# Altium PCB STEP_DRIVER_V3.0.PcbDoc (part 5 of 5)
Units mm, origin at the board's own origin, x right, y up, seen from the top; angles counter-clockwise.
Board outline 245.25 x 200.25 mm, 2 copper layers (Top Layer, Bottom Layer), stack 1.371 mm thick; 477 components, 170 nets, 1104 pads, 876 vias.
Unrouted connection lines stored in the file: 4.
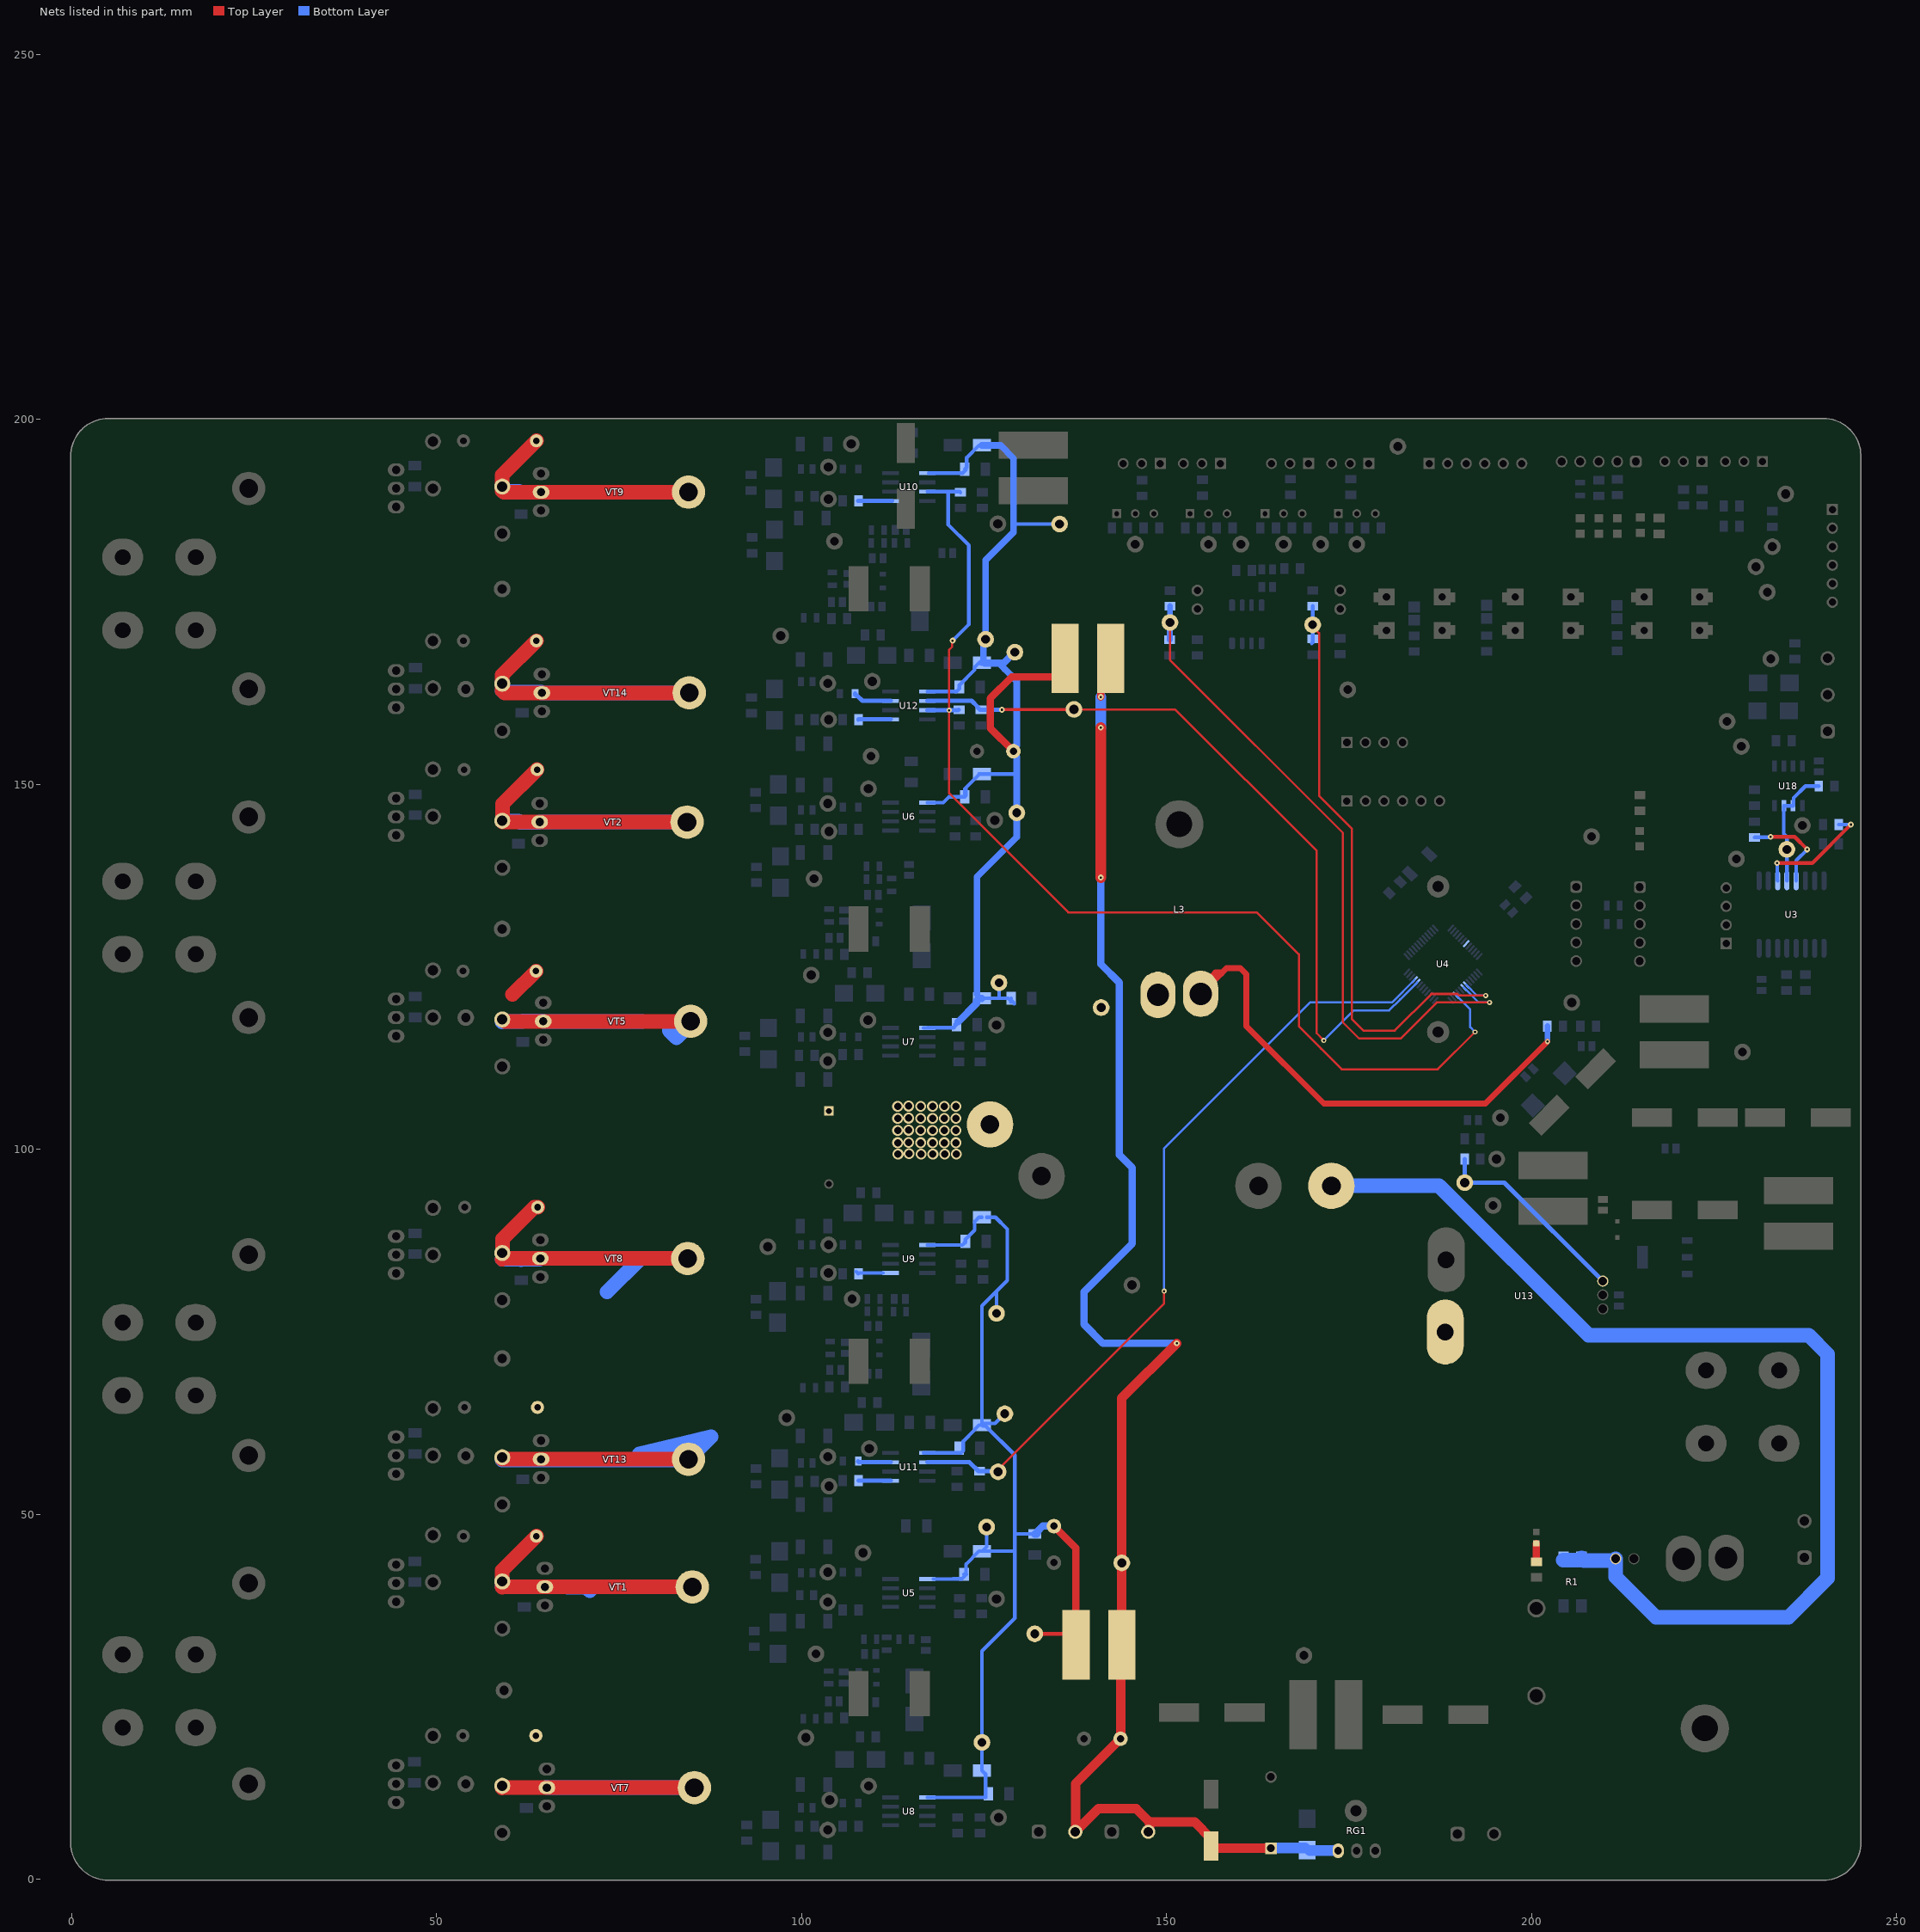
[diagram p4: the nets of this part, all layers, seen from the top]

## Via types
v1: diameter 0.7/0.7 (per signal layer), hole 0.3, Top Layer to Bottom Layer, tented both sides, 388 vias
v2: diameter 1.5/0.7 (per signal layer), hole 1, Top Layer to Bottom Layer, tented both sides, 206 vias
v3: diameter 0.8, hole 0.3, Top Layer to Bottom Layer, tented both sides, 99 vias
v4: diameter 1.5, hole 1, Top Layer to Bottom Layer, 96 vias
v5: diameter 0.5, hole 0.254, Top Layer to Bottom Layer, tented both sides, 42 vias
v6: diameter 1.27, hole 0.711, Top Layer to Bottom Layer, tented both sides, 22 vias
v7: diameter 1.27, hole 0.711, Top Layer to Bottom Layer, 17 vias
v8: diameter 1.27, hole 0.711, Top Layer to Bottom Layer, tented top, 2 vias
v9: diameter 1, hole 0.5, Top Layer to Bottom Layer, 2 vias
v10: diameter 0.7, hole 0.254, Top Layer to Bottom Layer, tented both sides, 2 vias

## Nets (pads, with @x,y where several pads share a name; then routed paths per layer and width w, separated by ;. In a path a pad name is that pad's centre, name@x,y a point inside that pad or via, vN(x,y) a via of type N, cw(c..) or ccw(c..) an arc to the next point about the centre after c; other vN are vias at no path point) (continued)
NetR50_2: R50.2 R82.2 U4.22 U10.3 U12.3 | length 154.2
  Top Layer w0.3: v3(120.7,169.7) 120.639,169.64 120.639,168.85 120.189,168.4 120.189,160.192 v1(120.229,160.153) 120.229,148.796 136.55,132.475 162.368,132.475 168.125,126.718 168.125,116.854 171.179,113.8 174.004,110.975 187.168,110.975 v1(192.268,116.075)
  Bottom Layer w0.3: U4.22@189.656,121.117 191.6,119.172 191.6,116.743 v1(192.268,116.075)
  Bottom Layer w0.5: U10.3@117.232,190.101 120.1,190.101 ; v3(120.7,169.7) 122.925,171.925 122.925,182.743 120.1,185.568 120.1,190.101 ; R50.2@121.768,190.001 121.668,190.101 120.1,190.101
  Bottom Layer w0.6: U12.3@117.232,160.175 117.243,160.164 120.218,160.164 v1(120.229,160.153) 120.248,160.172 121.456,160.172 R82.2@121.51,160.226
NetR51_2: R51.2 U9.5 | length 3.8
  Bottom Layer w0.5: R51.2@107.493,83.24 R51.2@107.769,82.965 ; R51.2@107.769,83.071 U9.5@111.133,83.071
NetR52_2: R52.2 U10.5 | length 4.7
  Bottom Layer w0.6: R52.2@107.742,188.857 107.769,188.831 U10.5@112.204,188.831 U10.5@112.383,188.831
NetR54_2: R54.2 TP3.1 U13.3 | length 27.7
  Bottom Layer w0.6: R54.2@190.862,98.675 TP3.1@190.862,95.445 196.287,95.445 U13.3@209.779,81.953
NetR75_1: R75.1 U11.7 | length 4.5
  Bottom Layer w0.6: R75.1@107.768,57.29 107.768,57.24 107.873,57.135 U11.7@112.204,57.135
NetR78_1: R78.1 U12.7 | length 5.4
  Bottom Layer w0.6: R78.1@107.343,162.436 107.343,162.286 107.493,162.136 107.643,162.136 108.334,161.445 U12.7@112.204,161.445
NetR79_2: R79.2 TP61.1 U4.33 U11.2 | length 107.7
  Top Layer w0.3: TP61.1@126.718,55.9 149.678,78.86 v1(149.678,80.575)
  Bottom Layer w0.3: v1(149.678,80.575) 149.678,100.128 169.675,120.125 180.882,120.125 183.995,123.238 U4.33@183.999,123.238
  Bottom Layer w0.6: U11.2@117.232,57.135 123.007,57.135 R79.2@124.242,55.9 ; R79.2@124.242,55.9 TP61.1@126.8,55.9
NetR81_2: R81.2 TP62.1 U4.32 U12.2 | length 104.4
  Top Layer w0.3: v3(127.45,160.225) v3@127.475,160.25 ; 136.062,160.25 136.087,160.275 ; TP62.1@137.975,160.275 151.175,160.275 170.568,140.882 170.568,115.9 v1(171.543,114.925)
  Top Layer w0.4: v3@127.475,160.25 136.062,160.25 ; 136.087,160.275 TP62.1@137.975,160.275
  Bottom Layer w0.3: v1(171.543,114.925) 175.648,119.03 180.498,119.03 182.001,120.533 U4.32@184.352,122.884
  Bottom Layer w0.6: U12.2@117.232,161.445 123.296,161.445 124.142,160.599 124.142,160.513 124.445,160.21 124.596,160.21 124.604,160.217 127.442,160.217 v3(127.45,160.225)
NetR91_1: R91.1 R95.2 TP17.1 U4.19 | length 96.3
  Top Layer w0.3: TP17.1@150.469,171.819 150.469,167.056 174.156,143.369 174.156,117.412 176.393,115.175 182.068,115.175 187.018,120.125 v1(194.251,120.125)
  Bottom Layer w0.3: U4.19@190.716,122.177 192.768,120.125 v1(194.251,120.125)
  Bottom Layer w0.8: R91.1@150.414,169.799 150.441,169.826 150.441,172.153 TP17.1@150.469,172.181 R95.2@150.469,174.416
NetR92_1: R92.1 R96.2 TP18.1 U4.18 | length 85.8
  Top Layer w0.3: TP18.1@170.023,171.867 170.023,171.6 170.891,170.732 170.891,148.459 175.418,143.932 175.418,117.825 176.968,116.275 181.279,116.275 186.296,121.292 189.85,121.292 190.055,121.087 193.706,121.087 v1(193.718,121.075)
  Bottom Layer w0.3: U4.18@191.07,122.531 192.513,121.087 193.706,121.087 v1(193.718,121.075)
  Bottom Layer w0.5: 169.896,169.309 170.023,169.436 TP18.1@170.023,171.867 R96.2@170.023,174.447
NetR103_2: R103.2 U11.5 | length 4.4
  Bottom Layer w0.5: R103.2@107.769,54.623 R103.2@107.783,54.609
  Bottom Layer w0.6: R103.2@107.797,54.595 U11.5@112.204,54.595
NetR104_2: R104.2 U12.5 | length 4.5
  Bottom Layer w0.5: R104.2@107.743,158.846 107.769,158.871 R104.2@107.802,158.905
  Bottom Layer w0.6: R104.2@107.802,158.905 U12.5@112.204,158.905
NetR119_2: R119.2 U3.13 | length 12.9
  Top Layer w0.5: v3(232.75,142.817) 236.057,142.817 v3(237.777,141.097)
  Bottom Layer w0.5: R119.2@230.55,142.724 230.597,142.771 232.703,142.771 v3(232.75,142.817) ; U3.13@236.26,136.8 236.26,139.579 v3(237.777,141.097)
NetR121_1: R121.1 VD18.2 | length 2.5
  Top Layer w1: R121.1@200.675,43.501 VD18.2@200.675,45.976
NetR122_2: R122.2 U3.11 | length 16.4
  Top Layer w0.5: v3(233.65,139.225) 238.488,139.225 v3(243.762,144.499)
  Bottom Layer w0.5: v3(233.65,139.225) 233.685,139.19 233.685,136.835 U3.11@233.72,136.8 ; R122.2@242.098,144.499 v3(243.762,144.499)
NetR125_2: R125.2 TP12.1 U3.12 U18.2 U18.3 | length 16.9
  Bottom Layer w0.5: U3.12@234.99,136.8 234.99,142.817 234.565,143.242 U18.3@234.565,147.063 U18.2@235.835,147.063 235.903,147.131 235.903,148.144 237.534,149.775 R125.2@239.349,149.775
NetU4_7: U4.7
V_BAT: C7.2 C14.1 C32.1 C39.1 C42.1 C48.2 C56.2 C69.1 C70.2 C71.1 C73.2 C74.2 C75.1 C76.1 C79.2 C80.1 C81.2 C82.1 L3.2 TP6.1 VD1.2 VD2.2 VD5.2 VD6.2 VD9.2 VD10.2 VD13.2 VD14.2 VT1.D VT2.D VT5.D VT7.D VT8.D VT9.D VT13.D VT14.D | length 457.6
  Top Layer w2: VD14.2@58.99,57.546 VT13.D@64.317,57.546 VT13.D@84.51,57.546 VT13.D@84.543,57.546 ; VD5.2@59,12.514 VD5.2@59.032,12.546 ; VD5.2@59,12.546 VD5.2@59.032,12.546 ; VD1.2@59,40.008 VD1.2@59,40.8 59,42.325 C14.1@63.675,47 ; VD9.2@59,84.975 59.038,85.013 59.038,87.721 63.392,92.075 C82.1@63.85,92.075 ; VD6.2@59,117.8 59.054,117.8 59.308,117.546 VT5.D@64.617,117.546 VT5.D@84.81,117.546 ; VD13.2@59,162.805 VD13.2@59,163.8 59,165 C76.1@63.675,169.675 ; VD10.2@59,190.195 VD10.2@59,190.8 59,192.4 C80.1@63.675,197.075 ; VD5.2@59.038,12.553 VD5.2@59.032,12.546 ; VD1.2@59.038,40.046 59.054,40.062 59.18,40.062 59.195,40.046 VT1.D@64.834,40.046 VT1.D@85.027,40.046 ; VD2.2@59.038,145.117 59.038,145.205 59.054,145.221 59.054,147.304 C32.1@63.775,152.025 ; VD2.2@59.054,144.846 VT2.D@64.117,144.846 VT2.D@84.31,144.846 ; VD13.2@59.054,162.805 59.313,162.546 VT14.D@64.417,162.546 VT14.D@84.61,162.546 ; VD10.2@59.054,190.195 59.203,190.046 VT9.D@64.317,190.046 VT9.D@84.51,190.046 ; VD9.2@59.083,85.013 59.18,85.013 59.212,85.046 VT8.D@64.217,85.046 ; 60.414,121.214 C71.1@63.625,124.425 ; VT8.D@64.217,85.075 VT8.D@83.689,85.075 ; VT7.D@85.31,12.546 VT7.D@65.117,12.546 VD5.2@59.032,12.546
  Bottom Layer w2: VD14.2@58.99,57.435 64.317,57.435 VT13.D@84.399,57.435 ; VD1.2@59,40.1 C48.2@61.964,40.065 ; VD9.2@59,84.975 59.038,84.937 61.563,84.937 C73.2@61.6,84.9 61.635,84.935 64.106,84.935 VT8.D@64.217,85.046 VT8.D@84.41,85.046 ; VD6.2@59,117.475 59.038,117.513 61.738,117.513 C70.2@61.8,117.575 64.588,117.575 VT5.D@64.617,117.546 78.206,117.546 ; VD13.2@59,162.805 59.054,162.805 59.209,162.65 C79.2@61.725,162.65 64.313,162.65 VT14.D@64.417,162.546 VT14.D@84.61,162.546 ; VD2.2@59.054,145.025 59.092,144.987 61.213,144.987 61.425,144.775 64.046,144.775 VT2.D@64.117,144.846 VT2.D@84.31,144.846 ; VD10.2@59.054,190.195 59.092,190.157 C74.2@61.284,190.157 ; C74.2@61.756,190.046 VT9.D@64.174,190.046 ; C48.2@62.025,40.077 64.834,40.045 70.557,39.978 70.975,39.55 ; VT9.D@64.46,190.046 VT9.D@84.51,190.046 ; VT7.D@65.049,12.614 VT7.D@65.117,12.546 VT7.D@85.31,12.546 ; 73.362,80.475 77.869,84.982 ; 77.779,58.277 83.977,59.766 87.6,60.636 VT13.D@84.51,57.546 ; 81.865,116.299 82.864,115.3 VT5.D@84.81,117.246
  other v2: 113.218,99.35 116.368,99.35 117.993,99.35 119.618,99.35 121.193,99.35 114.718,99.4 113.168,100.9 116.318,100.9 117.943,100.9 119.568,100.9 121.143,100.9 114.668,100.95 113.168,102.575 116.318,102.575 117.943,102.575 119.568,102.575 121.143,102.575 114.668,102.625 113.168,104.225 116.318,104.225 117.943,104.225 119.568,104.225 121.143,104.225 114.668,104.275 113.168,105.875 116.318,105.875 117.943,105.875 119.568,105.875 121.143,105.875 114.668,105.925
V_PS: C38.1 J12.2 L3.1 R1.2 R53.2 U13.5 | length 223.8
  Top Layer w0.8: L3.1@154.674,121.298 154.972,121.596 157.51,124.134 158.212,124.836 160.098,124.836 160.95,123.983 160.95,116.889 171.564,106.275 193.691,106.275 v1(202.192,114.776) ; L3.1@155.156,121.412 L3.1@156.108,121.412
  Top Layer w1: L3.1@154.674,121.298 154.674,122.06 156.748,124.134 157.51,124.134 ; C38.1@171.79,95 C38.1@172.593,95
  Bottom Layer w0.8: v1(202.192,114.776) R53.2@202.192,116.875
  Bottom Layer w2: C38.1@173.15,95 187.35,95 207.8,74.55 237.975,74.55 240.575,71.95 240.575,41.275 235.2,35.9 217.075,35.9 211.537,41.438 J12.2@211.537,43.916 211.296,43.675 207.175,43.675 R1.2@206.85,44 ; R1.2@204.35,43.7 R1.2@206.85,43.7
VCC: C3.2 C5.1 D32.1 J1.2 J13.2 L7.1 L8.1 RG1.1 TP88.1 ZD4.2 | length 224.2
  Top Layer w1: v3@141,137.25 v3(141.009,137.241) ; v3(141,161.975) 141,165.925 L7.1@142.35,167.275 ; L8.1@143.718,31.968 L8.1@143.875,32.125 ; J1.2@147.5,6.5 J1.2@147.682,6.682 ; 147.682,7.6 147.906,7.825 ; C3.2@156.125,5.55 C3.2@156.125,4.55 C3.2@156.438,4.237
  Top Layer w1.3: J13.2@137.495,6.505 140.666,9.675 145.825,9.675 147.5,8 ; J13.2@137.57,6.505 137.57,13.12 C5.1@143.7,19.25 ; C5.1@143.718,19.25 L8.1@143.718,31.968 ; L8.1@143.875,32.125 TP88.1@143.875,43.342 143.875,65.9 v3(151.4,73.425) ; J1.2@147.682,6.682 147.682,7.6 ; 147.906,7.825 153.85,7.825 C3.2@156.125,5.55 ; C3.2@156.438,4.237 D32.1@164.3,4.237
  Top Layer w1.5: v3@141,137.25 v3(141,157.775)
  Bottom Layer w1: v3(141.009,137.241) 141.009,125.367 143.525,122.851 143.525,99.25 145.3,97.475 145.3,87.075 138.7,80.475 138.7,76.025 141.3,73.425 v3(151.4,73.425) ; D32.1@164.3,4.237 D32.1@164.3,4.277 ; ZD4.2@168.973,4.277 ZD4.2@169.25,4 ; ZD4.2@169.3,4.277 ZD4.2@169.627,3.95 ; RG1.1@173.47,3.95 RG1.1@173.52,3.9
  Bottom Layer w1.5: v3(141,157.775) v3(141,161.975) ; D32.1@164.3,4.277 ZD4.2@168.973,4.277 ; ZD4.2@169.627,3.95 RG1.1@173.47,3.95
VCC_DRV_1: C4.1 C9.2 C15.2 C25.2 C34.2 C86.2 D1.2 D10.2 D11.2 D19.2 L8.2 TP79.1 TP81.1 TP83.1 TP85.1 TP89.1 U5.1 U8.1 U9.1 U11.1 | length 169.2
  Top Layer w0.5: TP89.1@131.95,33.625 136.125,33.625 137.575,32.175 L8.2@137.625,32.125
  Top Layer w1: C4.1@134.575,48.375 137.575,45.375 137.575,32.175 L8.2@137.575,31.879
  Bottom Layer w0.5: U11.1@116.712,58.411 117.403,58.411 117.409,58.417 117.421,58.405 121.843,58.405 122.143,58.705 122.143,59.994 123.768,61.619 123.768,61.665 124.318,62.215 D19.2@124.718,62.215 ; U8.1@117.232,11.214 125.208,11.214 125.208,14.407 D10.2@124.718,14.897 TP81.1@124.718,18.757 124.718,31.268 129.218,35.768 129.218,44.946 ; U9.1@117.232,86.881 122.043,86.881 122.443,87.281 C25.2@122.443,87.404 122.443,87.654 123.718,88.929 123.718,90.091 124.318,90.691 D11.2@124.718,90.691 ; U5.1@118.067,41.139 120.718,41.139 120.725,41.146 121.934,41.146 C9.2@122.568,41.779 ; C9.2@122.268,41.779 122.521,42.033 122.521,43.149 124.318,44.946 D1.2@124.718,44.946 D1.2@124.75,44.946 ; D19.2@124.818,62.115 125.218,62.115 129.218,58.115 129.218,47.3 ; TP79.1@125.35,48.25 125.35,45.546 D1.2@124.75,44.946 ; D11.2@125.35,90.691 126.559,90.691 128.19,89.06 128.19,82.036 126.718,80.564 ; TP83.1@126.718,77.525 126.718,80.564 ; TP85.1@127.85,63.775 126.511,62.436 124.939,62.436 D19.2@124.718,62.215 ; C86.2@131.95,47.3 129.218,47.3 ; D19.2@124.718,62.215 124.718,62.436 124.718,78.564 126.718,80.564 ; D1.2@124.75,44.946 129.218,44.946 ; 129.218,44.946 129.218,47.3
  Bottom Layer w1: C86.2@131.95,47.3 132.2,47.3 132.35,47.45 132.35,47.7 133.025,48.375 C4.1@134.575,48.375
VCC_DRV_2: C11.2 C16.2 C30.2 C36.2 C87.2 C88.1 D2.2 D6.2 D12.2 D20.2 L7.2 TP78.1 TP80.1 TP82.1 TP84.1 TP87.1 U6.1 U7.1 U10.1 U12.1 | length 170.9
  Top Layer w0.5: L7.2@134.475,164.7 136.1,166.325 L7.2@136.1,167.275
  Top Layer w1: C88.1@129.025,154.55 125.85,157.725 125.85,161.775 128.775,164.7 L7.2@134.475,164.7
  Bottom Layer w0.5: U7.1@116.724,116.634 U7.1@117.232,116.634 ; U6.1@117.232,147.49 119.397,147.49 120.192,148.285 C11.2@122.359,148.285 ; U12.1@117.232,162.715 121.22,162.715 121.62,163.115 C36.2@121.62,163.35 121.62,163.6 123.718,165.698 123.718,166.052 124.418,166.752 124.718,166.752 125.218,166.752 D20.2@125.067,166.601 ; U7.1@117.273,116.675 120.861,116.675 120.993,116.807 C16.2@120.993,117.097 ; U10.1@117.411,192.641 120.666,192.641 ; 120.666,192.64 122.061,192.64 C30.2@122.522,193.1 ; C16.2@121.211,117.065 121.211,117.223 C16.2@121.461,117.473 ; C30.2@122.343,193.175 122.622,193.454 122.622,194.755 124.318,196.451 D12.2@124.718,196.451 ; 122.537,149.521 122.537,148.464 C11.2@122.359,148.285 ; D6.2@124.05,121.298 D6.2@124.484,120.864 ; D2.2@124.31,151.419 D2.2@124.718,151.419 ; D6.2@124.318,120.698 127.07,120.698 ; D2.2@124.354,151.376 122.359,149.381 122.359,148.464 C11.2@122.359,148.285 ; D2.2@124.718,151.427 129.488,151.427 ; TP84.1@124.92,169.575 TP84.1@125.218,169.873 ; TP80.1@127.05,122.825 127.07,122.805 127.07,120.698 ; 127.837,165.802 127.846,165.802 ; C87.2@128.678,120.172 128.678,120.338 128.318,120.698 127.07,120.698 ; C87.2@128.718,120.698 128.718,120.332 128.834,120.332 129.118,120.048 C87.2@129.118,119.932 ; 129.05,185.675 TP82.1@135.35,185.675
  Bottom Layer w0.9: D6.2@124.05,121.298 124.05,137.357 129.488,142.795 129.488,151.427 129.488,153.789 129.025,154.252 129.025,154.848 129.481,155.303 129.481,164.167 127.846,165.802 ; D20.2@124.718,166.652 124.92,166.854 124.92,169.2 124.953,169.233 124.953,169.543 TP84.1@124.92,169.575 ; D12.2@124.718,196.451 127.267,196.451 129.05,194.668 129.05,185.675 129.05,184.55 125.218,180.718 TP84.1@125.218,169.873 ; 127.038,166.601 127.338,166.302 127.837,165.802
  Bottom Layer w1: C16.2@121.461,117.473 123.968,119.98 123.968,120.348 124.318,120.698 D6.2@124.686,120.698 ; D20.2@125.067,166.601 127.038,166.601 127.637,166.601 TP87.1@129.148,168.112
  Bottom Layer w2: TP87.1@129.148,168.112 TP87.1@129.225,168.112
pads on no net: L2.GND L3.GND P11.2 R2.1 R10.1 R10.2 R83.2 R84.2 R85.1 R86.1 R87.1 R87.2 R93.1 R93.2 R94.1 R94.2 R97.1 R98.1 R98.2 R99.1 R99.2 R100.1 R100.2 R101.1 R101.2 R102.1 R102.2 U3.3 U3.14
copper on no net: | length 27.1
  Bottom Layer w0.254: 223.75,15.725 223.75,20.548
  Bottom Layer w0.3: 180.525,135.131 180.632,135.024 180.632,133.676 185.413,128.895 ; 191.07,128.188 194.549,131.667 194.549,133.926 194.549,134.39 194.708,134.548 194.708,134.966 195.603,135.861 197.646,135.861 197.753,135.968 ; 207.03,250.311 207.089,250.37
  Bottom Layer w1: 166.91,193.963 166.91,193.978 166.924,193.963 166.949,193.938 166.949,191.814 166.975,191.788

## Polygon pours and split planes (outlines as drawn)
GND_2 on Bottom Layer "NONET_L-01_P-001" (solid, pour order 124): 225.228,132.592 245.188,132.592 245.188,171.288 234.345,171.288 225.228,162.17
GND on Bottom Layer "GND_L02_P122" (solid, pour order 122): 13.466,0.009 0.336,13.139 0.336,186.836 13.375,199.875 230.768,199.875 245,185.643 245,172.815 232.878,172.678 223.075,162.875 223.075,130.64 227.886,130.64 229.276,129.25 245.114,129.25 245,15.123 229.886,0.009
V_BAT on Bottom Layer "NONET_L-01_P-001" (solid, pour order 121): 64.888,198.55 64.888,195.63 62.45,193.191 62.45,191.221 66.27,191.221 66.27,189.137 63.209,189.137 58.395,189.137 57.875,189.657 57.875,195.053 61.372,198.55
V_BAT on Bottom Layer "NONET_L-01_P-001" (solid, pour order 120): 64.733,171.77 64.733,167.896 62.541,165.705 62.541,163.631 66.114,163.631 66.114,161.546 63.054,161.546 58.24,161.546 57.51,162.276 57.51,167.253 62.027,171.77
V_BAT on Bottom Layer "NONET_L-01_P-001" (solid, pour order 119): 64.836,154.264 64.836,150.611 62.331,148.106 62.331,145.835 66.217,145.835 66.217,143.751 63.157,143.751 58.343,143.751 57.613,144.48 57.613,149.457 62.42,154.264
V_BAT on Bottom Layer "NONET_L-01_P-001" (solid, pour order 118): 64.891,126.671 64.891,122.871 62.725,120.705 62.725,118.606 66.273,118.606 66.273,116.521 63.212,116.521 58.398,116.521 57.669,117.251 57.669,122.228 62.111,126.671
V_BAT on Bottom Layer "NONET_L-01_P-001" (solid, pour order 117): 64.791,94.275 64.791,90.883 62.086,88.177 62.086,86.01 66.173,86.01 66.173,83.925 63.112,83.925 58.45,83.925 57.569,84.806 57.569,89.632 62.212,94.275
V_BAT on Bottom Layer "NONET_L-01_P-001" (solid, pour order 116): 64.916,66.624 64.916,63.235 62.211,60.53 62.211,58.485 66.298,58.485 66.298,56.4 63.237,56.4 58.423,56.4 57.694,57.13 57.694,62.107 62.211,66.624
V_BAT on Bottom Layer "NONET_L-01_P-001" (solid, pour order 115): 64.718,49.171 64.718,45.297 63.039,43.618 63.039,41.032 66.099,41.032 66.099,38.947 63.039,38.947 58.225,38.947 57.495,39.677 57.495,44.654 62.012,49.171
V_BAT on Bottom Layer "NONET_L-01_P-001" (solid, pour order 96): 64.879,21.925 64.879,17.804 63.2,16.126 63.2,13.539 66.26,13.539 66.26,11.454 63.2,11.454 58.386,11.454 57.656,12.184 57.656,17.161 62.42,21.925
NetC12_1 on Bottom Layer "NONET_L-01_P-001" (solid, pour order 109): 61.4,38.501 57.9,34.08 57.9,32.55 61.571,32.55 66.283,36.325 66.283,38.501
NetC29_1 on Bottom Layer "NONET_L-01_P-001" (solid, pour order 108): 60.345,83.361 57.61,79.643 57.61,77.443 60.863,77.443 65.392,81.071 65.392,83.431
NetC31_1 on Bottom Layer "NONET_L-01_P-001" (solid, pour order 107): 60.269,188.421 57.67,184.89 57.67,182.69 60.923,182.69 65.452,186.318 65.452,188.494
NetC7_1 on Bottom Layer "NONET_L-01_P-001" (solid, pour order 106): 60.338,143.137 57.74,139.606 57.74,137.406 60.993,137.406 65.522,141.034 65.522,143.21
V_BAT on Bottom Layer "NONET_L-01_P-001" (solid, pour order 104): 63.852,194.658 89.325,194.575 89.325,198.55 63.245,198.55 62.425,197.731 62.425,196.085
V_BAT on Bottom Layer "NONET_L-01_P-001" (solid, pour order 103): 64.084,167.265 70.617,167.239 70.617,171.739 64.084,171.739 62.55,170.206 62.55,168.799
V_BAT on Bottom Layer "NONET_L-01_P-001" (solid, pour order 102): 64.009,149.79 70.542,149.764 70.542,154.264 64.009,154.264 62.475,152.731 62.475,151.324
V_BAT on Bottom Layer "NONET_L-01_P-001" (solid, pour order 101): 63.733,122.197 70.267,122.171 70.267,126.671 63.733,126.671 62.2,125.138 62.2,123.731
V_BAT on Bottom Layer "NONET_L-01_P-001" (solid, pour order 100): 63.871,90.014 70.617,89.987 70.617,94.275 64.083,94.275 62.55,92.742 62.55,91.335
V_BAT on Bottom Layer "NONET_L-01_P-001" (solid, pour order 99): 63.984,62.451 70.517,62.425 70.517,66.625 63.684,66.625 62.45,65.392 62.45,63.985
V_BAT on Bottom Layer "NONET_L-01_P-001" (solid, pour order 98): 63.95,44.697 70.484,44.671 70.484,49.171 63.95,49.171 62.417,47.638 62.417,46.231
V_BAT on Bottom Layer "NONET_L-01_P-001" (solid, pour order 97): 64.233,17.451 70.767,17.425 70.767,21.925 64.233,21.925 62.7,20.392 62.7,18.985
NetC37_1 on Bottom Layer "NETC37_1_L02_P080" (solid, pour order 80): 51.769,155.19 46.76,160.198 46.76,164.395 54.155,164.395 57.604,160.946 65.56,160.946 65.56,158.699 61.225,155.19
NetC41_1 on Bottom Layer "NETC41_1_L02_P079" (solid, pour order 79): 58.745,109.589 52.878,109.589 47.077,115.39 47.077,118.884 55.056,118.884 58.066,115.875 65.737,115.875 65.737,113.536 60.862,109.589
NetC35_1 on Bottom Layer "NETC35_1_L02_P078" (solid, pour order 78): 58.728,49.994 52.339,49.994 47.06,55.273 47.06,59.143 54.582,59.143 57.704,56.021 65.72,56.021 65.72,53.661 61.191,49.994
NetC24_1 on Bottom Layer "NETC24_1_L02_P073" (solid, pour order 73): 59.407,4.899 53.017,4.899 47.739,10.178 47.739,14.375 54.393,14.375 57.843,10.925 66.399,10.925 66.399,8.565 61.87,4.899
NetC76_2 on Bottom Layer "NETC76_2_L02_P076" (solid, pour order 76): 43.337,192.185 43.337,193.726 47.798,198.187 54.221,198.187 56.629,196.137 56.629,181.816 60.404,178.119 60.404,174.597 52.187,165.387 45.854,165.387 45.071,164.659 43.075,164.679 43.075,181.834 51.1,189.859 51.1,191.091 50.045,192.146
NetC32_2 on Bottom Layer "NETC32_2_L02_P075" (solid, pour order 75): 43.215,147.225 43.215,148.502 47.938,153.225 54.361,153.225 56.769,151.175 56.769,136.528 60.544,132.831 60.544,129.636 51.678,119.698 45.211,119.698 43.286,119.698 43.215,136.873 51.034,144.692 51.034,146.336 50.185,147.185
NetC75_2 on Bottom Layer "NETC75_2_L02_P074" (solid, pour order 74): 43.322,87.234 43.322,88.864 47.695,93.237 54.118,93.237 56.526,91.187 56.526,76.713 60.301,73.016 60.301,69.647 52.084,60.437 45.751,60.437 44.968,59.709 43.322,59.725 43.322,76.997 51,84.675 51,86.138 49.942,87.196
V_BAT on Bottom Layer "V_BAT_L02_P004" (solid, pour order 4): 67.625,2.775 67.625,197.725 89.343,197.725 89.343,2.775
NetC37_1 on Bottom Layer "NETC37_1_L02_P037" (solid, pour order 37): 3.9,157.019 3.9,174.881 41.022,174.881 41.022,157.019
NetC7_1 on Bottom Layer "NETC7_1_L02_P036" (solid, pour order 36): 3.745,133.175 3.745,151.036 41.022,151.036 41.022,133.175
NetC41_1 on Bottom Layer "NETC41_1_L02_P035" (solid, pour order 35): 3.745,111.969 3.745,129.831 41.022,129.831 41.022,111.969
NetC29_1 on Bottom Layer "NETC29_1_L02_P034" (solid, pour order 34): 3.616,73.125 3.616,90.986 41.022,90.986 41.022,73.125
NetC35_1 on Bottom Layer "NETC35_1_L02_P033" (solid, pour order 33): 3.745,52.069 3.745,69.931 41.022,69.931 41.022,52.069
NetC24_1 on Bottom Layer "NETC24_1_L02_P031" (solid, pour order 31): 14.657,7.069 3.745,17.981 3.745,24.931 41.022,24.931 41.022,7.069
NetC14_2 on Bottom Layer "NETC14_2_L02_P040" (solid, pour order 40): 43.296,42.225 43.296,43.502 48.019,48.225 54.442,48.225 56.85,46.175 56.85,31.896 60.625,28.199 60.625,24.635 52.409,15.425 46.075,15.425 45.292,14.697 43.296,14.717 43.296,31.872 51.115,39.691 51.115,41.335 50.266,42.184
NetC31_1 on Bottom Layer "NETC31_1_L02_P038" (solid, pour order 38): 3.781,178.337 3.823,182.707 17.467,196.35 41.022,196.35 41.022,178.337
NetC12_1 on Bottom Layer "NETC12_1_L02_P032" (solid, pour order 32): 3.8,28.194 3.8,46.056 41.022,46.056 41.022,28.194
V_BAT on Bottom Layer "V_BAT_L02_P009" (solid, pour order 9): 126.193,107.623 126.193,98.25 119.509,98.25 117.772,96.825 101.953,96.825 85.025,79.898 85.025,117.763 95.165,107.623
V_BAT on Bottom Layer "V_BAT_L02_P007" (solid, pour order 7): 116.1,104.725 116.1,98.85 81.525,98.85 81.525,104.725
GND on Top Layer "tgh" (solid, pour order 57): 13.718,-0.25 -0.12,13.587 -0.12,186.345 13.535,200 230.85,200 245.114,185.736 245.114,172.786 232.875,172.675 223.075,162.875 223.075,130.64 227.886,130.64 229.276,129.25 245.114,129.25 245.114,14.309 230.555,-0.25
GND_2 on Top Layer "NONET_L-01_P-001" (solid, pour order 123): 225.228,132.525 245.188,132.525 245.188,171.22 234.345,171.22 225.228,162.103
V_BAT on Top Layer "NONET_L-01_P-001" (solid, pour order 92): 64.617,125.096 64.617,122.677 62.564,120.625 62.564,116.454 58.394,116.454 57.664,117.184 57.664,122.564 60.647,125.547 63.314,125.547 64.077,125.547
V_BAT on Top Layer "NONET_L-01_P-001" (solid, pour order 114): 65.14,19.96 65.14,17.894 63.461,16.215 63.461,11.544 58.647,11.544 57.917,12.273 57.917,17.25 61.331,20.664 64.436,20.664
GND on Top Layer "GND_L01_P111" (solid, pour order 111): 132.125,75.175 132.125,66.225 114.754,66.225 114.754,75.175
NetJ3_2 on Top Layer "NETJ3_2_L01_P053" (solid, pour order 53): 195.7,89.225 187.008,89.225 187.008,80.559 190.691,80.559 206.35,64.9 236.674,64.9 236.674,74.76 210.165,74.76
GND on Top Layer "GND_L01_P110" (solid, pour order 110): 131.625,134.2 131.625,125.15 114.229,125.15 114.229,134.2
GND on Top Layer "GND_L01_P113" (solid, pour order 113): 132.069,180.757 132.069,171.698 114.824,171.698 114.824,180.757
GND on Top Layer "GND_L01_P112" (solid, pour order 112): 134.125,30.25 134.125,21.2 114.904,21.2 114.904,30.25
NetC76_2 on Top Layer "NETC76_2_L01_P048" (solid, pour order 48): 109.175,180.775 109.175,172.85 95.825,172.85 50.375,172.85 50.375,180.775
NetC32_2 on Top Layer "NETC32_2_L01_P047" (solid, pour order 47): 109.077,134.05 109.077,126.33 96.045,126.33 50.053,126.33 50.053,134.05
NetC75_2 on Top Layer "NETC75_2_L01_P046" (solid, pour order 46): 109.175,74.95 109.175,67.025 96.294,67.025 50.575,67.025 50.575,74.95
NetC14_2 on Top Layer "NETC14_2_L01_P045" (solid, pour order 45): 109.13,29.325 109.13,21.4 48.175,21.4 48.175,29.325 96.045,29.325
NetC7_1 on Top Layer "NETC7_1_L01_P068" (solid, pour order 68): 58.53,137.367 52.141,137.367 46.862,142.646 46.862,146.576 54.174,146.576 57.613,143.137 65.522,143.137 65.522,141.034 60.993,137.367
V_BAT on Top Layer "NONET_L-01_P-001" (solid, pour order 95): 64.937,47.371 64.937,45.304 62.614,42.982 62.614,38.954 58.444,38.954 57.714,39.684 57.714,44.414 61.347,48.047 63.364,48.047 64.127,48.047
V_BAT on Top Layer "NONET_L-01_P-001" (solid, pour order 94): 64.879,64.981 64.879,62.915 62.556,60.592 62.556,56.45 58.501,56.45 57.656,57.295 57.656,62.656 60.658,65.658 64.069,65.658
V_BAT on Top Layer "NONET_L-01_P-001" (solid, pour order 93): 65.054,92.371 65.054,90.909 62.28,88.136 62.28,83.875 58.544,83.875 57.831,84.588 57.831,89.659 61.219,93.047 63.481,93.047 64.244,93.047
V_BAT on Top Layer "NONET_L-01_P-001" (solid, pour order 91): 64.85,152.295 64.85,150.836 62.331,148.317 62.331,143.925 58.526,143.925 57.613,144.838 57.613,149.653 60.884,152.925 64.096,152.925
V_BAT on Top Layer "NONET_L-01_P-001" (solid, pour order 90): 64.933,170.073 64.933,168.007 62.61,165.684 62.61,161.657 58.44,161.657 57.71,162.387 57.71,167.21 61.25,170.75 63.36,170.75 64.123,170.75
V_BAT on Top Layer "NONET_L-01_P-001" (solid, pour order 89): 64.798,197.573 64.798,195.507 62.475,193.184 62.475,188.976 58.485,188.976 57.665,189.796 57.665,194.668 61.247,198.25 63.225,198.25 63.988,198.25
NetC76_2 on Top Layer "NONET_L-01_P-001" (solid, pour order 88): 54.139,198.204 46.367,198.204 43.238,195.075 43.238,192.172 46.394,192.172 47.319,193.097 52.187,193.097 54.642,195.551 54.642,197.701
NetC76_2 on Top Layer "NONET_L-01_P-001" (solid, pour order 87): 54.159,170.654 46.387,170.654 43.258,167.525 43.258,164.622 46.414,164.622 47.34,165.547 52.208,165.547 54.662,168.001 54.662,170.151
NetC32_2 on Top Layer "NONET_L-01_P-001" (solid, pour order 86): 54.164,153.079 46.392,153.079 43.263,149.95 43.263,147.047 46.419,147.047 47.344,147.972 52.212,147.972 54.667,150.426 54.667,152.576
NetC32_2 on Top Layer "NONET_L-01_P-001" (solid, pour order 85): 54.251,125.625 46.35,125.625 43.286,122.561 43.286,119.657 46.441,119.657 47.367,120.582 52.235,120.582 54.689,123.036 54.689,125.187
NetC75_2 on Top Layer "NONET_L-01_P-001" (solid, pour order 84): 54.114,93.179 46.342,93.179 43.213,90.05 43.213,87.147 46.369,87.147 47.294,88.072 52.162,88.072 54.9,90.81 54.9,92.393
NetC75_2 on Top Layer "NONET_L-01_P-001" (solid, pour order 83): 54.183,65.792 46.411,65.792 43.282,62.663 43.282,59.759 46.438,59.759 47.363,60.684 52.231,60.684 54.85,63.303 54.85,65.124
NetC14_2 on Top Layer "NONET_L-01_P-001" (solid, pour order 82): 54.189,48.204 46.417,48.204 43.288,45.075 43.288,42.172 46.444,42.172 47.369,43.097 52.237,43.097 54.692,45.551 54.692,47.701
NetC14_2 on Top Layer "NONET_L-01_P-001" (solid, pour order 81): 54.197,20.75 46.425,20.75 43.296,17.621 43.296,14.717 46.452,14.717 47.378,15.643 52.246,15.643 54.7,18.097 54.7,20.247
NetC24_1 on Top Layer "NETC24_1_L01_P077" (solid, pour order 77): 59.407,4.899 53.017,4.899 47.739,10.178 47.739,14.375 54.393,14.375 57.843,10.925 66.399,10.925 66.399,8.565 61.87,4.899
NetC12_1 on Top Layer "NETC12_1_L01_P072" (solid, pour order 72): 59.168,32.567 52.779,32.567 47.5,37.846 47.5,41.776 53.849,41.776 57.2,38.425 66.16,38.425 66.16,36.233 61.631,32.567
NetC35_1 on Top Layer "NETC35_1_L01_P027" (solid, pour order 27): 3.941,52.069 3.941,70.059 41.022,70.059 41.022,52.069
NetC35_1 on Top Layer "NETC35_1_L01_P071" (solid, pour order 71): 58.725,49.997 52.336,49.997 47.057,55.276 47.057,59.206 54.544,59.206 57.825,55.925 65.717,55.925 65.717,53.664 61.188,49.997
NetC29_1 on Top Layer "NETC29_1_L01_P070" (solid, pour order 70): 58.368,77.429 51.979,77.429 46.7,82.708 46.7,86.638 54.499,86.638 57.742,83.395 65.36,83.395 65.36,81.095 60.831,77.429
NetC41_1 on Top Layer "NETC41_1_L01_P069" (solid, pour order 69): 60.839,109.589 52.878,109.589 47.153,115.314 47.153,119.244 54.431,119.244 57.8,115.875 65.813,115.875 65.813,113.518 61.625,110.247
NetC31_1 on Top Layer "NETC31_1_L01_P067" (solid, pour order 67): 58.46,182.671 52.071,182.671 46.792,187.949 46.792,191.88 54.477,191.88 57.916,188.44 65.452,188.44 65.452,186.337 60.923,182.671
NetC37_1 on Top Layer "NETC37_1_L01_P065" (solid, pour order 65): 57.693,155.917 51.451,155.917 46.9,160.468 46.9,164.399 54.201,164.399 57.641,160.959 65.56,160.959 65.56,158.856 61.93,155.917
V_PS on Top Layer "V_PS_L01_P054" (solid, pour order 54): 160.95,124.5 160.95,116.891 183.05,94.791 183.05,82.508 186.435,79.123 189.884,79.123 189.884,70.523 182.602,70.523 170.321,82.804 170.321,92.662 152.261,110.722 152.261,115.1 152.261,109.3 152.261,121.109 152.261,124.5
V_BAT on Top Layer "V_BAT_L01_P055" (solid, pour order 55): 111.707,96.825 111.821,108.526 124.472,108.526 127.246,111.08 142.621,125.236 146.17,125.236 151.245,116.854 136.359,101.967 129.55,100.525 126.193,98.25 119.509,98.25 117.738,96.825
NetC31_1 on Top Layer "NETC31_1_L01_P021" (solid, pour order 21): 3.792,178.083 3.872,183.102 17.166,196.396 41.149,196.396 41.022,178.083
NetC24_1 on Top Layer "NETC24_1_L01_P029" (solid, pour order 29): 14.508,7.075 3.745,17.838 3.745,24.9 41.022,24.9 41.022,7.075
NetC12_1 on Top Layer "NETC12_1_L01_P028" (solid, pour order 28): 3.745,28.208 3.745,46.015 41.022,46.015 41.022,28.208
NetC29_1 on Top Layer "NETC29_1_L01_P026" (solid, pour order 26): 3.745,72.783 3.745,90.887 41.022,90.887 41.022,72.783
NetC41_1 on Top Layer "NETC41_1_L01_P025" (solid, pour order 25): 3.65,111.969 3.65,129.934 41.022,129.934 41.022,111.969
NetC7_1 on Top Layer "NETC7_1_L01_P024" (solid, pour order 24): 3.745,132.858 3.745,151.15 41.022,151.15 41.022,132.858
NetC37_1 on Top Layer "NETC37_1_L01_P023" (solid, pour order 23): 3.745,157.019 3.745,175.034 41.022,175.034 41.022,157.019

## Other copper
Top Layer:
  rectangle net GND: 190.05,17.7 194.4,28.775
  rectangle net GND: 153.3,10.55 158.85,12.35
  rectangle net GND: 150.7,17.516 153.271,27.1
  rectangle net GND: 112.749,192.92 117.203,200
  rectangle net GND: 187.95,20.525 195.975,25.975
  rectangle net GND: 148.325,19.95 154.8,25.125
  pour cut-out: 98.4,173.401 98.4,172.065 99.814,172.065 99.814,173.401
  pour cut-out: 97.812,127.408 97.812,125.95 99.337,125.95 99.337,127.408
  pour cut-out: 97.993,67.901 97.993,66.565 99.689,66.565 99.689,67.901
  pour cut-out: 98.546,22.611 98.546,21.275 102.093,21.275 102.093,22.611
  pour cut-out: 225.228,132.525 225.228,162.125 233.678,170.575 248.243,170.575 248.243,172.812 232.875,172.675 223.075,162.875 223.075,130.95 225.781,130.95 226.361,131.53 226.996,131.53 229.276,129.25 246.55,129.25 246.55,132.5 246.575,132.525
  pour cut-out: 216.865,39.64 230.884,39.64 230.884,49.09 216.865,49.09
  pour cut-out: 208.275,83.1 208.275,76.945 211.3,76.945 211.3,83.1
Bottom Layer:
  pour cut-out: 104.952,23.026 104.952,21.097 106.919,21.097 106.919,23.026
  pour cut-out: 105.051,68.391 105.051,66.461 107.017,66.461 107.017,68.391
  pour cut-out: 104.83,127.65 104.83,125.721 106.797,125.721 106.797,127.65
  pour cut-out: 105.358,173.685 105.358,171.756 107.324,171.756 107.324,173.685
  pour cut-out: 225.228,132.525 225.228,162.125 233.678,170.575 248.243,170.575 248.243,172.815 232.878,172.678 223.075,162.875 223.075,130.95 225.781,130.95 226.361,131.53 226.996,131.53 229.276,129.25 246.55,129.25 246.55,132.5 246.575,132.525
  pour cut-out: 216.475,49.1 216.475,39.3 230.875,39.3 230.925,39.25 230.925,48.925 230.75,49.1

## Silkscreen, mask and mechanical layers (free items; w line width, h text height)
Top Overlay:
  circle w0.254: c239.55,5 r2.5
  circle w0.254: c240,195 r2.5
  circle w0.254: c5,195 r2.5
  circle w0.254: c43.868,100.3 r2.5
  circle w0.254: c5,4.975 r2.5
  text "5V" at 164.791,197.579 h0.8 r90
  text "5V" at 144.516,197.514 h0.8 r90
  text "5V" at 173.067,197.493 h0.8 r90
  text "5V" at 226.846,197.491 h0.8 r90
  text "5V" at 152.715,197.454 h0.8 r90
  text "D3+" at 175.675,197.346 h0.8 r90
  text "INT" at 221.316,197.354 h0.8 r90
  text "5V" at 218.734,197.339 h0.8 r90
  text "GND" at 232.008,197.237 h0.8 r90
  text "GND" at 157.92,197.2 h0.8 r90
  text "GND" at 149.495,197.15 h0.8 r90
  text "GND" at 169.914,197.138 h0.8 r90
  text "GND" at 223.958,197.162 h0.8 r90
  text "TIM" at 229.386,197.154 h0.8 r90
  text "D4-" at 146.85,197.092 h0.8 r90
  text "D4+" at 155.355,197.092 h0.8 r90
  text "D3-" at 167.42,197.092 h0.8 r90
  text "GND" at 178.215,197.092 h0.8 r90
  text "5V" at 204.447,196.967 h0.8 r90
  text "L1" at 206.987,196.967 h0.8 r90
  text "L2" at 209.461,196.967 h0.8 r90
  text "L3" at 212.067,196.967 h0.8 r90
  text "GND" at 214.724,196.554 h0.8 r90
  text "4" at 11.525,187.95 h3
  text "5V" at 188.591,187.954 h0.8 r90
  text "3.3V" at 234.129,187.654 h0.8
  text "GND" at 199.491,187.104 h0.8 r90
  text "3.3V" at 186.091,186.404 h0.8 r90
  text "STOP" at 193.991,186.129 h0.8 r90
  text "START" at 191.291,185.679 h0.8 r90
  text "H" at 19.639,185.629 h0.8 r90
  text "CLEAR" at 196.516,185.504 h0.8 r90
  text "5V" at 235.687,185.177 h0.8
  text "RX" at 235.731,182.194 h0.8
  text "TX" at 235.509,180.069 h0.8
  text "STOP" at 199.449,177.954 h1.2
  text "START" at 181.145,177.8 h1.2
  text "CLEAR" at 216.568,177.77 h1.2
  text "DIR" at 234.907,177.419 h0.8
  text "GND" at 234.767,174.641 h0.8
  text "A" at 232.65,169.35 h1
  text "L" at 18.697,167.246 h0.8 r270
  text "GND" at 231.625,161.664 h1
  text "3.3V" at 175.165,158.101 h0.8 r90
  text "DIO" at 177.375,158.101 h0.8 r90
  text "CLC" at 180.138,158.101 h0.8 r90
  text "GND" at 182.881,158.101 h0.8 r90
  text "B" at 232.75,156.973 h1
  text "GND" at 187.918,151.25 h0.8 r90
  text "RX_1" at 185.39,151.187 h0.8 r90
  text "3.3V" at 174.982,151.06 h0.8 r90
  text "DIO" at 177.903,151.06 h0.8 r90
  text "CLC" at 180.443,151.06 h0.8 r90
  text "TX_1" at 182.977,151.06 h0.8 r90
  text "3" at 9.075,145.225 h3
  text "DIR" at 216.875,142.1 h1
  text "H" at 19.414,140.629 h0.8 r90
  text "GND" at 209.054,135.954 h0.8
  text "SCL" at 209.154,132.929 h0.8
  text "SDA" at 209.219,130.554 h0.8
  text "3.3V" at 209.229,128.129 h0.8
  text "5V" at 209.229,125.304 h0.8
  text "L" at 18.447,122.471 h0.8 r270
  text "2" at 9.7,84.225 h3
  text "H" at 19.414,80.679 h0.8 r90
  text "L" at 18.422,62.646 h0.8 r270
  text "GND    VCC" at 243.525,54.925 h2 r90
  text "1" at 10.7,38.475 h3
  text "H" at 19.214,35.479 h0.8 r90
  text "b" at 153.55,30.808 h40
  text "L" at 18.372,17.371 h0.8 r270
  text "-" at 120.237,15.862 h0.8 r180
  text "IN GND  +14V  GND  +14V" at 127.254,0.804 h1
  text "5V" at 187.704,0.529 h1.2
  text "GND" at 194.179,0.529 h1.2
Bottom Overlay:
  text "4" at 13.762,188.078 h3
  text "3" at 11.312,145.353 h3
  text "2" at 11.937,84.353 h3
  text "1" at 12.937,38.603 h3
  text "jekadesigner777@gmail.com" at 52.721,1.512 h1.52
Top Solder:
  lines w0.254: 223.8,59.6 223.925,59.725
  lines w2: 60.569,115.006 64.617,115.006
  lines w3: 126.396,103.525 125.468,103.525 125.864,103.129 129.254,103.129 148.25,122.125 148.768,122.125 ; 154.45,119.85 154.45,117.025 177.525,93.95 177.525,83.168 185.535,75.158 189.193,75.158
  lines w4: 151.859,69.125 178.113,69.125 187.638,59.6 209.488,59.6 223.8,59.6 ; 162.593,69.454 162.593,95 ; 223.925,59.725 233.925,59.725
  lines w5: 59.244,70.905 106.176,70.905 ; 59.344,130.205 106.276,130.205 ; 59.644,176.73 106.576,176.73 ; 60.068,25.45 107,25.45 ; 117.198,130.034 128.875,130.1 ; 117.225,70.8 129.529,70.914 ; 117.425,176.788 129.35,176.8 ; 117.575,25.45 130.283,25.478 ; 188.189,84.636 194.002,84.636 208.913,69.725 233.925,69.725
  text "5mm" at 76.525,24.8 h1.52
Bottom Solder:
  region: 80.329,144.846
  region: 80.329,144.846
  region: 72.75,143.7
  region: 72.75,143.7
  lines w0.254: 80.329,162.546 84.61,162.546 ; 81.589,187.125 80.329,187.125 81.829,187.125 ; 83.25,190.046 84.51,190.046 ; 84.471,190.007 84.51,190.046 ; 84.848,13.008 85.31,12.546 ; 129.35,176.25 133.175,176.25 ; 132.893,98.653 134.05,97.496 ; 84.51,190.046 84.51,190.046
  lines w2: 60.569,115.006 64.617,115.006 ; 79.968,13.4 79.968,103.125 80.549,103.125 ; 80.329,13.761 80.593,14.025
  lines w3: 80.593,13.008 80.593,12.546 85.113,12.546 ; 128.673,129.794 130.506,129.794 ; 129.075,70.675 131.725,70.675 132.268,71.218
  lines w4: 80.329,144.9 85.026,144.9 ; 80.329,162.6 85.025,162.6 ; 80.549,103.125 125.536,103.125 125.822,103.411 ; 80.554,40.1 85.25,40.1 ; 80.554,57.489 85.25,57.489 ; 80.554,85.129 85.25,85.129 ; 80.554,117.6 85.25,117.6 ; 80.593,13.008 80.329,13.008 80.329,187.125 83.21,190.007 84.471,190.007 ; 128.673,128.1 128.673,137.223 ; 128.7,137.25 133.025,141.575 133.025,176.1 133.175,176.25 128.9,176.25 ; 129.075,70.675 138.633,61.117 138.633,30.033 134.275,25.675 131.1,25.675
  lines w5: 130.506,129.794 135.661,124.639 135.661,107.361 132.893,104.593 132.893,98.653 ; 132.9,96.355 132.9,74.634 132.9,69.136 132.911,69.125 156.275,69.125 178,69.125 187.525,59.6 224.275,59.6 233.375,59.6 233.775,60 ; 162.2,95.075 162.975,94.3 162.975,69.375
  text "1" at 183.65,942.463 h2.5
  text "2" at 391.743,942.463 h2.5
  text "3" at 600.157,942.462 h2.5
  text "4" at 808.41,942.463 h2.5
  text "5" at 1016.824,942.462 h2.5
  text "6" at 1225.077,942.462 h2.5
  text "1" at 176.072,941.317 h2.5
  text "2" at 384.164,941.317 h2.5
  text "3" at 592.578,941.316 h2.5
  text "4" at 800.831,941.317 h2.5
  text "5" at 1009.245,941.316 h2.5
  text "6" at 1217.498,941.316 h2.5
  text "A" at 81.936,844.829 h2.5
  text "A" at 1326.948,844.829 h2.5
  text "A" at 74.357,843.683 h2.5
  text "A" at 1319.37,843.683 h2.5
  text "B" at 82.099,644.729 h2.5
  text "B" at 1327.111,644.729 h2.5
  text "B" at 74.52,643.583 h2.5
  text "B" at 1319.533,643.583 h2.5
  text "G" at 1184.36,519.384 h2.5
  text "N" at 1185.971,519.385 h2.5
  text "D" at 1187.582,519.385 h2.5
  text "G" at 1176.781,518.238 h2.5
  text "N" at 1178.392,518.239 h2.5
  text "D" at 1180.003,518.239 h2.5
  text "C" at 82.099,444.467 h2.5
  text "C" at 1327.111,444.467 h2.5
  text "C" at 74.52,443.321 h2.5
  text "C" at 1319.533,443.321 h2.5
  text "D" at 1327.111,244.207 h2.5
  text "D" at 1319.533,243.061 h2.5
  text "2" at 391.743,146.574 h2.5
  text "3" at 600.157,146.573 h2.5
  text "4" at 808.41,146.574 h2.5
  text "5" at 1016.824,146.573 h2.5
  text "6" at 1225.077,146.573 h2.5
  text "2" at 384.164,145.428 h2.5
  text "3" at 592.578,145.427 h2.5
  text "4" at 800.831,145.428 h2.5
  text "5" at 1009.245,145.427 h2.5
  text "6" at 1217.498,145.427 h2.5
Mechanical 1:
  circle w0.254: c239.55,5 r1.5
  circle w0.254: c240,195 r1.5
  circle w0.254: c5,5 r1.5
  circle w0.254: c43.868,100.3 r1.5
  circle w0.254: c5,195 r1.5
  lines w0.254: 0,4.914 0,194.914 ; 0,5 ccw(c5,5) 5,0 240,0 ccw(c240,5) 245,5 ; 0,195 cw(c5,195) 5,200 240.027,200 cw(c240,195) 245,195 ; 245,5.115 245,195.115

## Text inside footprints (layer, text, board x,y; h text height)
C1: Top Overlay "+" at 240.183,106.509 h1.52; Top Overlay "-" at 232.182,106.763 h1.52
C2: Top Overlay "+" at 159.883,25.009 h1.52; Top Overlay "-" at 151.882,25.263 h1.52
C45: Top Overlay "+" at 183.167,20.391 h1.52 r180; Top Overlay "-" at 191.168,20.137 h1.52 r180
C57: Top Overlay "+" at 204.529,103.718 h1.52 r225; Top Overlay "-" at 210.366,109.195 h1.52 r225
C58: Top Overlay "-" at 225.318,89.287 h1.52 r180; Top Overlay "+" at 217.317,89.541 h1.52 r180
C90: Top Overlay "-" at 116.712,196.58 h1.52 r270; Top Overlay "+" at 116.458,188.579 h1.52 r270
C91: Top Overlay "+" at 217.317,102.191 h1.52 r180; Top Overlay "-" at 225.318,101.937 h1.52 r180
LED3: Top Overlay "K" at 155.494,177.834 h0.8 r90; Mechanical 15 "K" at 155.494,177.834 h0.8 r90
LED4: Top Overlay "K" at 175.052,177.834 h0.8 r90; Mechanical 15 "K" at 175.052,177.834 h0.8 r90
P12: Top Overlay "1" at 206.921,122.787 h1.02; Top Overlay "5" at 205.734,122.787 h1.02
P14: Top Overlay "5" at 213.289,122.784 h1.02; Top Overlay "1" at 214.889,122.784 h1.02
SW1: Top Overlay "*" at 213.216,176.564 h0.8; Mechanical 13 "*" at 216.314,174.748 h0.8
SW2: Top Overlay "*" at 177.91,176.564 h0.8; Mechanical 13 "*" at 181.008,174.748 h0.8
SW3: Top Overlay "*" at 195.563,176.564 h0.8; Mechanical 13 "*" at 198.661,174.748 h0.8
U5: Bottom Overlay "*" at 117.803,41.567 h0.8; Mechanical 13 "*" at 116.648,40.387 h0.8
U6: Bottom Overlay "*" at 117.803,147.921 h0.8; Mechanical 13 "*" at 116.648,146.741 h0.8
U7: Bottom Overlay "*" at 117.803,117.065 h0.8; Mechanical 13 "*" at 116.648,115.885 h0.8
U8: Bottom Overlay "*" at 117.803,11.645 h0.8; Mechanical 13 "*" at 116.648,10.465 h0.8
U9: Bottom Overlay "*" at 117.803,87.312 h0.8; Mechanical 13 "*" at 116.648,86.132 h0.8
U10: Bottom Overlay "*" at 117.803,193.072 h0.8; Mechanical 13 "*" at 116.648,191.892 h0.8
U11: Bottom Overlay "*" at 117.803,58.836 h0.8; Mechanical 13 "*" at 116.648,57.656 h0.8
U12: Bottom Overlay "*" at 117.803,163.146 h0.8; Mechanical 13 "*" at 116.648,161.966 h0.8